# Altium PCB Pukk-Sensor-PCB.PcbDoc (part 2 of 6)
Units mil, origin at the board's own origin, x right, y up, seen from the top; angles counter-clockwise.
Board outline 3937.01 x 3149.61 mil, 4 copper layers (Top Layer, Layer 1, Layer 2, Bottom Layer), stack 61.653 mil thick; 261 components, 166 nets, 704 pads, 236 vias.
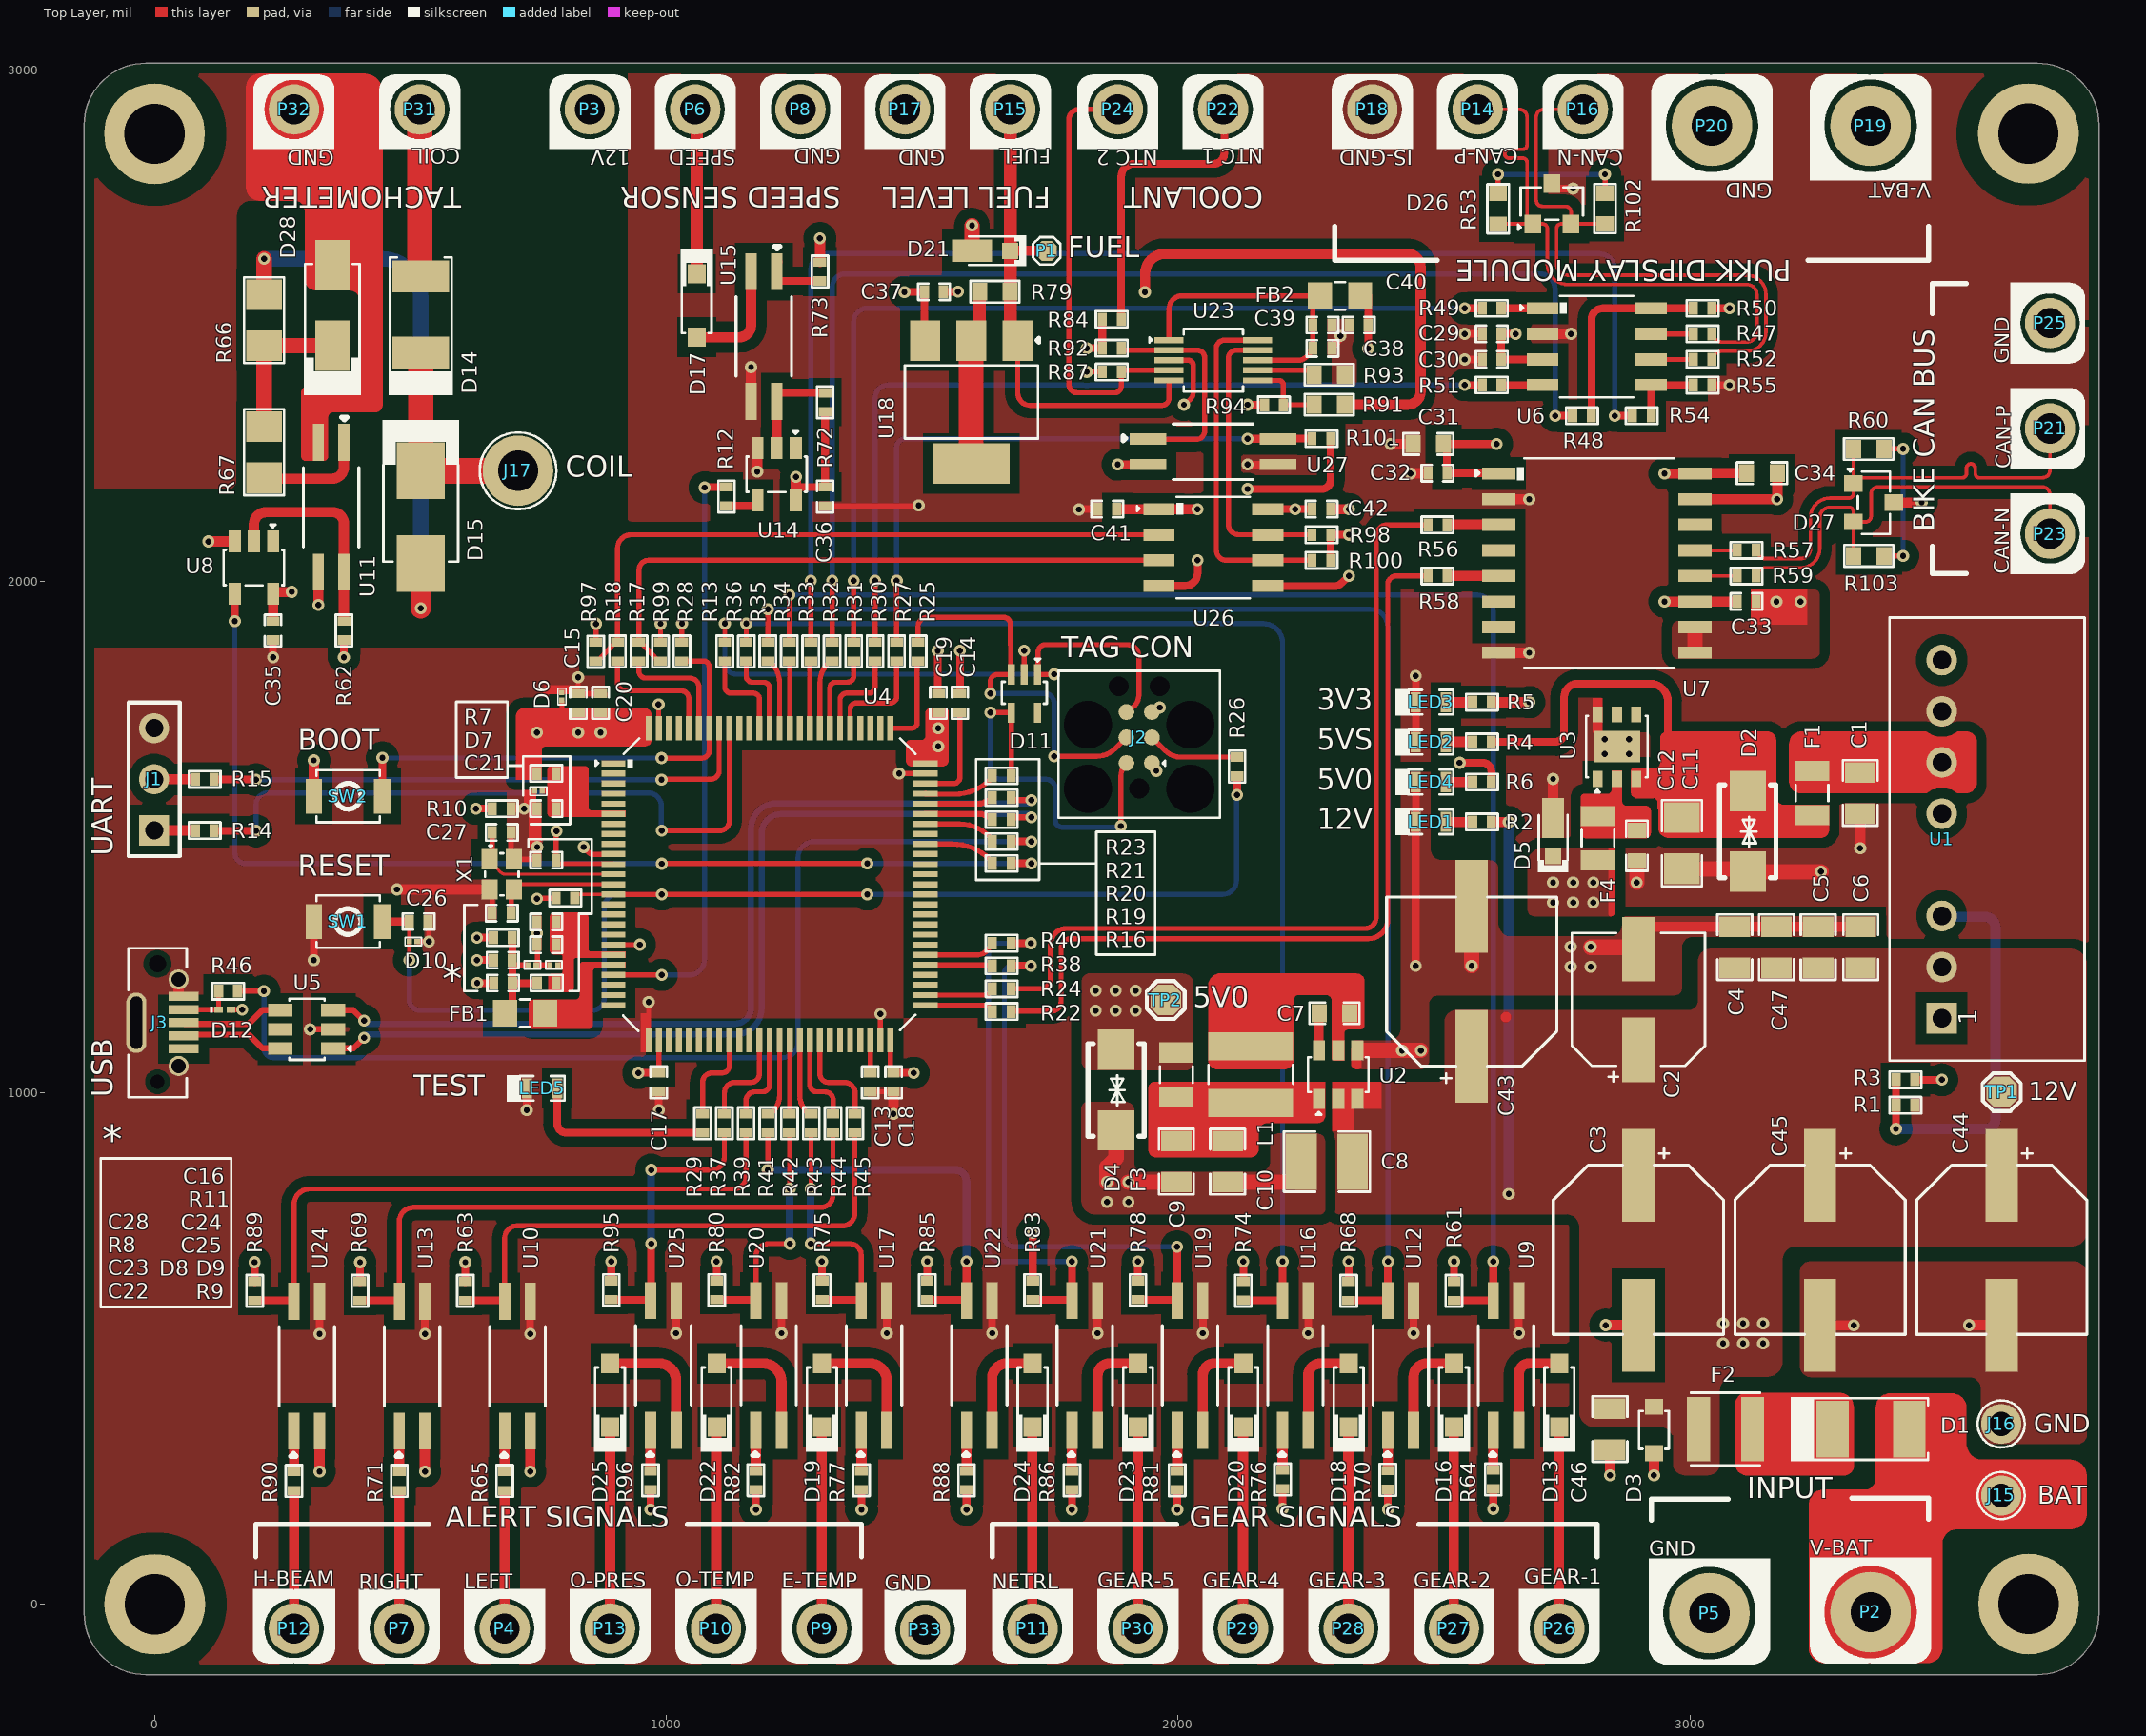
[diagram p0: Top Layer view]

## Part data (continued)
C16 C17 C18 C19 C20 C23 C25 C26 C29 C32 C33: library part CC0402JRX7R7BB104, "CAP CER 0.1UF 16V X7R 0402", Case Code (Imperial)=0402, Case Code (Metric)=1005, Dielectric=X7R, LCSC Part Number=C541464, Manufacturer=Yageo, Max Operating Temperature=125°C, Min Operating Temperature=-55°C, Package Quantity=10000, Supplier Part Number=311-1676-1-ND, Tolerance=5%, Voltage Rating=16V, Case/Package=0402, Category="Ceramic Capacitors", ComponentLink1Description=https://datasheet.ciiva.com/13210/upy-gphc-x7r-6-3v-to-50v-8-12304-13210152.pdf?src-supplier=Mouser, ComponentLink1URL=https://datasheet.ciiva.com/13210/upy-gphc-x7r-6-3v-to-50v-8-12304-13210152.pdf?src-supplier=Mouser, Construction=Flat, Halogen Free="Halogen Free", Height=0.5mm, Item Type=Capacitor, Lead Free="Lead Free", Length=0.039inch, Manufacturer Part Number=CC0402JRX7R7BB104, Material=4241ConductorMaterial, Mounting Technology="Surface Mount", Packaging="Tape and Reel", Pricing="1=0.1, 10=0.046, 50=0.0262, 100=0.0203, 500=0.01528, 1000=0.012, 2500=0.01091, 5000=0.01004 (USD)", RoHS=Yes, RoHS Compliant=Yes, Series=CC, Stock=1659111, Supplier=Digikey, Thickness=0.022inch, Voltage Rating (DC)=16V, Width=0.02inch
C21 C22 C24 C39 C40: library part CC0402KRX5R8BB105, "CAP CER 1UF 25V X5R 0402", Case Code (Imperial)=0402, Case Code (Metric)=1005, Dielectric=X5R, LCSC Part Number=C326568, Manufacturer=Yageo, Max Operating Temperature=85°C, Min Operating Temperature=-55°C, Package Quantity=10000, Supplier Part Number 1=603-CC402KRX5R8BB105, Tolerance=10%, Voltage Rating=25V, Capacitance=1uF, Case/Package=0402, Category="Ceramic Capacitors", ComponentLink1Description=http://www.mouser.com/ds/2/447/Yageo_UPY-GP_NP0_16V-to-50V_9-358835.pdf?src-supplier=Mouser, ComponentLink1URL=http://www.mouser.com/ds/2/447/Yageo_UPY-GP_NP0_16V-to-50V_9-358835.pdf?src-supplier=Mouser, ComponentLink2Description=http://www.yageo.com/documents/recent/UPY-GPHC_X5R_4V-to-50V_25.pdf?src-supplier=Digi-Key, ComponentLink2URL=http://www.yageo.com/documents/recent/UPY-GPHC_X5R_4V-to-50V_25.pdf?src-supplier=Digi-Key, ComponentLink3Description=https://4donline.ihs.com/images/VipMasterIC/IC/YAGO/YAGO-S-A0006851646/YAGO-S-A0006851646-1.pdf?hkey=6D3A4C79FDBF58556ACFDE234799DDF0&src-supplier=Newark, ComponentLink3URL=https://4donline.ihs.com/images/VipMasterIC/IC/YAGO/YAGO-S-A0006851646/YAGO-S-A0006851646-1.pdf?hkey=6D3A4C79FDBF58556ACFDE234799DDF0&src-supplier=Newark, Halogen Free="Halogen Free", Lead Free="Lead Free", Length=0.039inch, Manufacturer Part Number=CC0402KRX5R8BB105, Mount="Surface Mount", Packaging="Tape and Reel", Pricing 1="1=0.30000, 10=0.20400, 50=0.20400, 100=0.11600, 1000=0.07200, 10000=0.05900 (USD)", RoHS=Yes, RoHS Compliant=Yes, Stock 1=91975, Supplier 1=Mouser, Termination=SMD/SMT, Thickness=0.022inch, Voltage Rating (DC)=25V, Weight=2.3E-05oz, Width=0.02inch
C27 C28: library part GJM1555C1H120GB01D, "CAP CER 12PF 50V C0G/NP0 0402", Case Code (Imperial)=0402, Case Code (Metric)=1005, Dielectric=C0G, LCSC Part Number=C161305, Manufacturer=Murata, Max Operating Temperature=125°C, Min Operating Temperature=-55°C, Package Quantity=10000, Supplier Part Number 1=490-8078-1-ND, Tolerance=2%, Voltage Rating=50V, Capacitance=12pF, Case/Package=0402, Category="Ceramic Capacitors", ComponentLink1Description=https://datasheet.ciiva.com/11608/product-11608208.pdf?src-supplier=Avnet, ComponentLink1URL=https://datasheet.ciiva.com/11608/product-11608208.pdf?src-supplier=Avnet, ComponentLink2Description=https://datasheet.ciiva.com/29542/partnumbering-e-01-29542716.pdf?src-supplier=Digi-Key, ComponentLink2URL=https://datasheet.ciiva.com/29542/partnumbering-e-01-29542716.pdf?src-supplier=Digi-Key, ComponentLink3Description=https://datasheet.ciiva.com/29542/partnumbering-e-01-29542715.pdf?src-supplier=Digi-Key, ComponentLink3URL=https://datasheet.ciiva.com/29542/partnumbering-e-01-29542715.pdf?src-supplier=Digi-Key, ComponentLink4Description=https://datasheet.ciiva.com/29542/partnumbering-e-01-29542717.pdf?src-supplier=Digi-Key, ComponentLink4URL=https://datasheet.ciiva.com/29542/partnumbering-e-01-29542717.pdf?src-supplier=Digi-Key, Construction=Flat, Depth=0.5mm, Height=0.5mm, Lead Free="Lead Free", Length=1mm, Manufacturer Part Number=GJM1555C1H120GB01D, Mount="Surface Mount", Packaging="Tape and Reel", Pricing 1="1=0.18000, 10=0.12600, 50=0.07560, 100=0.06390, 500=0.04370, 1000=0.03865, 2500=0.03698, 5000=0.03361 (USD)", Radiation Hardening=No, RoHS=Yes, RoHS Compliant=Yes, Series=GJM, Stock 1=266975, Supplier 1=Digi-Key, Termination=SMD/SMT, Thickness=0.022inch, Voltage Rating (DC)=50V, Width=0.5mm
C35 C36 C37 C38 C41 C42: library part CC0402KRX7R8BB104, "CAP CER 0.1UF 25V X7R 0402", Capacitance=100nF, Case Code (Imperial)=0402, Case Code (Metric)=1005, Dielectric=X7R, LCSC Part Number=C105883, Manufacturer=Yageo, Max Operating Temperature=125°C, Min Operating Temperature=-55°C, Resistor Type=Ceramic, Supplier Part Number 1=311-2077-1-ND, Tolerance=10%, Voltage Rating=25V, Case/Package=0402, Category="Ceramic Capacitors", ComponentLink1Description=https://datasheet.ciiva.com/11464/upy-gphc-x7r-6-3v-to-50v-8-11464889.pdf?src-supplier=Avnet, ComponentLink1URL=https://datasheet.ciiva.com/11464/upy-gphc-x7r-6-3v-to-50v-8-11464889.pdf?src-supplier=Avnet, ComponentLink2Description=https://datasheet.ciiva.com/13210/upy-gphc-x7r-6-3v-to-50v-8-12304-13210908.pdf?src-supplier=Mouser, ComponentLink2URL=https://datasheet.ciiva.com/13210/upy-gphc-x7r-6-3v-to-50v-8-12304-13210908.pdf?src-supplier=Mouser, ComponentLink3Description=https://datasheet.ciiva.com/17437/upy-gphc-x7r-6-3v-to-50v-8-17437357.pdf?src-supplier=Avnet+Europe, ComponentLink3URL=https://datasheet.ciiva.com/17437/upy-gphc-x7r-6-3v-to-50v-8-17437357.pdf?src-supplier=Avnet+Europe, Depth=0.5mm, Dissipation Factor=3.5%, Halogen Free="Halogen Free", Height=0.5mm, Lead Free="Lead Free", Length=1mm, Manufacturer Part Number=CC0402KRX7R8BB104, Mount="Surface Mount", Packaging="Tape and Reel", Pricing 1="1=0.10000, 10=0.03100, 50=0.01700, 100=0.01390, 500=0.00990, 1000=0.00777, 2500=0.00707, 5000=0.00650 (USD)", Radiation Hardening=No, RoHS=Yes, Stock 1=1841009, Supplier 1=Digi-Key, Termination=SMD/SMT, Thickness=0.022inch, Voltage Rating (DC)=25V, Width=0.02inch
C46: library part GRM21BR61E226ME44L, "CAP CER 22UF 25V X5R 0805", Case Code (Imperial)=0805, Case Code (Metric)=2012, Dielectric=X5R, LCSC Part Number=C86816, Manufacturer=Murata, Max Operating Temperature=85°C, Min Operating Temperature=-55°C, Package Quantity=3000, Resistor Type=Ceramic, Tolerance=20%, Voltage=25V, Capacitance=22uF, Case/Package=0805, Category="Ceramic Capacitors", ComponentLink1Description=https://datasheet.ciiva.com/22787/1747471-22787265.pdf?src-supplier=Farnell, ComponentLink1URL=https://datasheet.ciiva.com/22787/1747471-22787265.pdf?src-supplier=Farnell, ComponentLink2Description=https://datasheet.ciiva.com/7719/1747471-7719095.pdf?src-supplier=Element14, ComponentLink2URL=https://datasheet.ciiva.com/7719/1747471-7719095.pdf?src-supplier=Element14, ComponentLink3Description=https://datasheet.ciiva.com/28584/1747471-28584199.pdf?src-supplier=Element14, ComponentLink3URL=https://datasheet.ciiva.com/28584/1747471-28584199.pdf?src-supplier=Element14, Construction=Flat, Depth=1.25mm, Height=1.25mm, Item Type=Capacitor, Lead Free="Lead Free", Length=2mm, Manufacturer Part Number=GRM21BR61E226ME44L, Material=Ceramic, Mount="Surface Mount", Packaging="Tape and Reel", Pricing 1="1=0.45930, 10=0.35000, 25=0.33950, 50=0.26910, 100=0.22090, 250=0.21320, 500=0.16760, 1000=0.14640, 3000=0.11710, 6000=0.10550, 15000=0.10450 (USD)", REACH SVHC="No SVHC", RoHS=Yes, RoHS Compliant=Yes, Series=GRM, Stock 1=21193, Supplier 1="Arrow Electronics", Supplier Part Number 1=GRM21BR61E226ME44L, Termination=SMD/SMT, Thickness=0.057inch, Voltage Rating=25V, Voltage Rating (DC)=25V, Weight=0.000335oz, Width=1.25mm
C47: library part CC0805KKX7R8BB475, "CAP CER 4.7UF 25V X7R 0805", Case Code (Imperial)=0805, Case Code (Metric)=2012, Dielectric=X7R, LCSC Part Number=C354262, Manufacturer=Yageo, Max Operating Temperature=125°C, Min Operating Temperature=-55°C, Package Quantity=3000, Tolerance=10%, Voltage Rating=25V, Case/Package=0805, ComponentLink1Description=http://www.mouser.com/ds/2/447/Yageo_UPY-GP_NP0_16V-to-50V_9-358835.pdf?src-supplier=Mouser, ComponentLink1URL=http://www.mouser.com/ds/2/447/Yageo_UPY-GP_NP0_16V-to-50V_9-358835.pdf?src-supplier=Mouser, ComponentLink2Description=http://www.yageo.com/documents/recent/UPY-GPHC_X7R_6.3V-to-50V_18.pdf?src-supplier=Digikey, ComponentLink2URL=http://www.yageo.com/documents/recent/UPY-GPHC_X7R_6.3V-to-50V_18.pdf?src-supplier=Digikey, ComponentLink3Description=https://www.yageo.com/upload/media/product/productsearch/datasheet/mlcc/UPY-GPHC_X7R_6.3V-to-50V_18.pdf?src-supplier=Digikey, ComponentLink3URL=https://www.yageo.com/upload/media/product/productsearch/datasheet/mlcc/UPY-GPHC_X7R_6.3V-to-50V_18.pdf?src-supplier=Digikey, ComponentLink4Description=https://datasheet.octopart.com/CC0805KKX7R8BB475-Yageo-datasheet-166511530.pdf?src-supplier=Future+Electronics, ComponentLink4URL=https://datasheet.octopart.com/CC0805KKX7R8BB475-Yageo-datasheet-166511530.pdf?src-supplier=Future+Electronics, ComponentLink5Description=https://datasheet.octopart.com/CC0805KKX7R8BB475-Yageo-datasheet-140260305.pdf?src-supplier=Newark, ComponentLink5URL=https://datasheet.octopart.com/CC0805KKX7R8BB475-Yageo-datasheet-140260305.pdf?src-supplier=Newark, ComponentLink6Description=https://datasheet.octopart.com/CC0805KKX7R8BB475-Yageo-datasheet-137700082.pdf?src-supplier=Future+Electronics, ComponentLink6URL=https://datasheet.octopart.com/CC0805KKX7R8BB475-Yageo-datasheet-137700082.pdf?src-supplier=Future+Electronics, Halogen Free=5694HalogenFree, Height=950um, Item Type=Capacitors, Lead Free=5697LeadFree, Manufacturer Part Number=CC0805KKX7R8BB475, Material=4241ConductorMaterial, Mounting Technology="Surface Mount", Packaging="Tape and Reel", Pricing="25=1.316, 250=1.053, 500=0.856, 1000=0.724, 2500=0.658 (DKK)", RoHS=Yes, RoHS Compliant=Yes, Series=CC, Stock=150, Supplier=Rs, Termination=SMD/SMT, Voltage Rating (DC)=25V, Weight=0.000194oz
D1: "60V 700mV@2A 2A SMA(DO-214AC) Schottky Barrier Diodes (SBD) ROHS", LCSC Part Number=C14238, Manufacturer=MDD, Package=SMA(DO-214AC), ComponentLink1Description=LCSC, ComponentLink1URL=https://www.lcsc.com/product-detail/Schottky-Barrier-Diodes-SBD_MDD-Microdiode-Electronics-SS26_C14238.html, Item Type=Diode, Manufacturer Part Number=SS26
D2 D4: "TVS DIODE 5VWM 9.2VC SMA", LCSC Part Number=C693487, Manufacturer=FTR, Package=SMA(DO-214AC), ComponentLink1Description=LCSC, ComponentLink1URL=https://www.lcsc.com/product-detail/TVS_GOODWORK-SMAJ5-0CA_C908809.html, Item Type=Diode, Manufacturer Part Number=SMAJ5.0CA
D3: "29V 350W 16.7V 15V SOD-323 ESD and Surge Protection (TVS/ESD) ROHS", LCSC Part Number=C780130, Manufacturer=SEMTECH, Package=SOD-323, ComponentLink1Description=LCSC, ComponentLink1URL=https://www.lcsc.com/product-detail/ESD-and-Surge-Protection-TVS-ESD_SEMTECH-SD15C-TCT_C780130.html?s_z=n_SD15C.TCT, Item Type=(TVS/ESD), Manufacturer Part Number=SD15C.TCT
D5: "TVS DIODE 3.3VWM 11.5VC MICROSMP", Breakdown Voltage=4.1V, Clamping Voltage=11V, LCSC Part Number=C241899, Manufacturer="Vishay Semiconductors", Max Operating Temperature=150°C, Max Reverse Leakage Current=200uA, Max Surge Current=75A, Min Operating Temperature=-55°C, Operating Supply Voltage=3.3V, Package Quantity=4500, Peak Pulse Current=87A, Peak Pulse Power=150W, Power Line Protection=No, Supplier Part Number=625-MSP3V3HM3, Test Current=1mA, Category="TVS Diodes", ComponentLink1Description=https://datasheet.ciiva.com/14080/msp3v3-14080471.pdf?src-supplier=Digikey, ComponentLink1URL=https://datasheet.ciiva.com/14080/msp3v3-14080471.pdf?src-supplier=Digikey, ComponentLink2Description=https://datasheet.ciiva.com/14080/msp3v3-14080471.pdf?src-supplier=Digi-Key, ComponentLink2URL=https://datasheet.ciiva.com/14080/msp3v3-14080471.pdf?src-supplier=Digi-Key, Diode Type=ZENER, Direction=Unidirectional, Item Type="TVS Diode", Manufacturer Part Number=MSP3V3HM3/89A, Min Breakdown Voltage=4.1V, Mounting Technology="Surface Mount", Number of Unidirectional Channels=1, Packaging="Tape and Reel", Polarity=Unidirectional, Pricing="1=0.39, 10=0.313, 50=0.313, 100=0.165, 1000=0.068, 10000=0.05 (USD)", Reverse Standoff Voltage=3.3V, RoHS=Yes, RoHS Compliant=Yes, Series="Automotive, AEC-Q101, TransZorb®, eSMP™", Stock=14861, Supplier=Mouser
D6 D7 D8 D9 D10: "DIODE BIDIR ESD X4DFN2", LCSC Part Number=C896720, Manufacturer="ON Semiconductor", Item Type=(TVS/ESD), Manufacturer Part Number=ESDM2033MX4T5G, Pricing="8961=0.04129, 9000=0.04018, 18000=0.03906, 45000=0.03794, 90000=0.03683, 450000=0.03571, 900000=0.0346 (USD)", RoHS=Yes, Series=-, Stock=629400, Supplier=Avnet
D11: "TVS DIODE 3VWM SOT323-5", LCSC Part Number=C703691, Manufacturer=STMicroelectronics, ComponentLink1Description=https://datasheet.ciiva.com/23847/cd00002946-23847220.pdf?src-supplier=Newark, ComponentLink1URL=https://datasheet.ciiva.com/23847/cd00002946-23847220.pdf?src-supplier=Newark, ComponentLink2Description=https://datasheet.ciiva.com/4509/cd00002946-81943-4509940.pdf?src-supplier=Mouser, ComponentLink2URL=https://datasheet.ciiva.com/4509/cd00002946-81943-4509940.pdf?src-supplier=Mouser, ComponentLink3Description=https://datasheet.ciiva.com/5782/cd00002946-5782886.pdf?src-supplier=Farnell, ComponentLink3URL=https://datasheet.ciiva.com/5782/cd00002946-5782886.pdf?src-supplier=Farnell, ComponentLink4Description=https://datasheet.ciiva.com/338/cd00002946-338376.pdf?src-supplier=Digikey, ComponentLink4URL=https://datasheet.ciiva.com/338/cd00002946-338376.pdf?src-supplier=Digikey, ComponentLink5Description=https://datasheet.ciiva.com/338/cd00002946-338377.pdf?src-supplier=Digikey, ComponentLink5URL=https://datasheet.ciiva.com/338/cd00002946-338377.pdf?src-supplier=Digikey, ComponentLink6Description=https://datasheet.ciiva.com/338/cd00002946-338378.pdf?src-supplier=Digikey, ComponentLink6URL=https://datasheet.ciiva.com/338/cd00002946-338378.pdf?src-supplier=Digikey, Item Type="TVS Diodes", Manufacturer Part Number=ESDALC6V1W5, Pricing="3000=0.0569, 9000=0.0547, 12000=0.0774, 15000=0.0538, 30000=0.0749, 45000=0.0518, 75000=0.05 (USD)", RoHS=Yes, Stock=3000, Supplier="Future Electronics"
D12: "TVS DIODE 3VWM ST0201", Breakdown Voltage=6.1V, Case Code (Imperial)=0201, Case Code (Metric)=0603, Clamping Voltage=12.2V, Leakage Current=100nA, Manufacturer=STMicroelectronics, Max Breakdown Voltage=8V, Max Operating Temperature=125°C, Max Power Dissipation=20W, Min Operating Temperature=-40°C, Peak Pulse Current=2A, Power Line Protection=No, Reverse Standoff Voltage=3V, Supplier Part Number=3110124, Test Current=1mA, Case/Package=0201, Category="TVS Diodes", ComponentLink1Description=https://datasheet.ciiva.com/1276/1684876-1276912.pdf?src-supplier=Element14, ComponentLink1URL=https://datasheet.ciiva.com/1276/1684876-1276912.pdf?src-supplier=Element14, ComponentLink2Description=https://datasheet.ciiva.com/4507/cd00212838-88488-4507763.pdf?src-supplier=Mouser, ComponentLink2URL=https://datasheet.ciiva.com/4507/cd00212838-88488-4507763.pdf?src-supplier=Mouser, ComponentLink3Description=https://datasheet.ciiva.com/16205/cd00212838-16205762.pdf?src-supplier=Future+Electronics, ComponentLink3URL=https://datasheet.ciiva.com/16205/cd00212838-16205762.pdf?src-supplier=Future+Electronics, ComponentLink4Description=https://datasheet.ciiva.com/15143/getdatasheetpartid-185245-15143908.pdf?src-supplier=Verical, ComponentLink4URL=https://datasheet.ciiva.com/15143/getdatasheetpartid-185245-15143908.pdf?src-supplier=Verical, ComponentLink5Description=https://datasheet.ciiva.com/22695/1684876-22695674.pdf?src-supplier=Element14, ComponentLink5URL=https://datasheet.ciiva.com/22695/1684876-22695674.pdf?src-supplier=Element14, ComponentLink6Description=https://datasheet.ciiva.com/337/cd00212838-337652.pdf?src-supplier=Digikey, ComponentLink6URL=https://datasheet.ciiva.com/337/cd00212838-337652.pdf?src-supplier=Digikey, ComponentLink7Description=https://datasheet.ciiva.com/337/cd00212838-337651.pdf?src-supplier=Digikey, ComponentLink7URL=https://datasheet.ciiva.com/337/cd00212838-337651.pdf?src-supplier=Digikey, ComponentLink8Description=https://datasheet.ciiva.com/337/cd00212838-337653.pdf?src-supplier=Digikey, ComponentLink8URL=https://datasheet.ciiva.com/337/cd00212838-337653.pdf?src-supplier=Digikey, ComponentLink9Description=https://datasheet.ciiva.com/11193/cd00212838-11193350.pdf?src-supplier=Avnet, ComponentLink9URL=https://datasheet.ciiva.com/11193/cd00212838-11193350.pdf?src-supplier=Avnet, ComponentLink10Description=https://datasheet.ciiva.com/41443/001184301-da-01-en-transil-sgl-un-esdalc6v1-1u2-st-0201-stm-41443159.pdf?src-supplier=Conrad, ComponentLink10URL=https://datasheet.ciiva.com/41443/001184301-da-01-en-transil-sgl-un-esdalc6v1-1u2-st-0201-stm-41443159.pdf?src-supplier=Conrad, Depth=0.3mm, Diode Type=ZENER, Direction=Unidirectional, ESD Protection=Yes, Height=0.33mm, Lead Free="Lead Free", Length=0.6mm, Manufacturer Part Number=ESDALC6V1-1U2, Max Reverse Leakage Current=100nA, Min Breakdown Voltage=6.1V, Mounting Technology="Surface Mount", Number of Channels=1, Number of Elements=1, Number of Unidirectional Channels=1, Packaging="Tape and Reel", Peak Pulse Power=20W, Pins=2, Polarity=Unidirectional, Power Dissipation=20W, Pricing="15000=0.0377, 45000=0.0364, 60000=0.0361, 150000=0.0351, 225000=0.0341 (USD)", Radiation Hardening=No, Reach SVHC Compliant=No, Reverse Breakdown Voltage=6.1V, RoHS=Yes, RoHS Compliant=Yes, Series="ESDA, TRANSIL™", Stock=405000, Supplier="Future Electronics", Termination=SMD/SMT, Width=0.35mm
D13 D16 D18 D19 D20 D22 D23 D24 D25: "100V 400mW Single 1.25V@150mA 8ns 300mA SOD-123 Switching Diode ROHS", LCSC Part Number=C917030, Manufacturer=JSMSEMI, Package=SOD-123, ComponentLink1Description=LCSC, ComponentLink1URL=https://www.lcsc.com/product-detail/Switching-Diode_JSMSEMI-1N4148W_C917030.html, Item Type=Diode, Manufacturer Part Number=1N4148W
D14: "DIODE STANDARD 100V 1A DO214AC", LCSC Part Number=C232818, Manufacturer="ON Semiconductor / Fairchild", ComponentLink1Description=https://datasheet.ciiva.com/13095/es1b-187537-13095611.pdf?src-supplier=Mouser, ComponentLink1URL=https://datasheet.ciiva.com/13095/es1b-187537-13095611.pdf?src-supplier=Mouser, ComponentLink2Description=https://datasheet.ciiva.com/918/es1a-918414.pdf?src-supplier=Digikey, ComponentLink2URL=https://datasheet.ciiva.com/918/es1a-918414.pdf?src-supplier=Digikey, ComponentLink3Description=https://datasheet.ciiva.com/918/es1a-918415.pdf?src-supplier=Digikey, ComponentLink3URL=https://datasheet.ciiva.com/918/es1a-918415.pdf?src-supplier=Digikey, ComponentLink4Description=https://datasheet.ciiva.com/918/es1a-918416.pdf?src-supplier=Digikey, ComponentLink4URL=https://datasheet.ciiva.com/918/es1a-918416.pdf?src-supplier=Digikey, ComponentLink5Description=https://datasheet.ciiva.com/28468/575529-28468958.pdf?src-supplier=Element14, ComponentLink5URL=https://datasheet.ciiva.com/28468/575529-28468958.pdf?src-supplier=Element14, ComponentLink6Description=https://datasheet.ciiva.com/7965/575529-7965132.pdf?src-supplier=Element14, ComponentLink6URL=https://datasheet.ciiva.com/7965/575529-7965132.pdf?src-supplier=Element14, Item Type=Diodes, Manufacturer Part Number=ES1B, Pricing="7500=0.0732, 22500=0.0629 (USD)", RoHS=Yes, Stock=142500, Supplier="Arrow Electronics"
D15: "DIODE ZENER 100V 3W SMB", LCSC Part Number=C150045, Manufacturer="ON Semiconductor", ComponentLink1Description=https://datasheet.ciiva.com/15142/getdatasheetpartid-53879-15142134.pdf?src-supplier=Verical, ComponentLink1URL=https://datasheet.ciiva.com/15142/getdatasheetpartid-53879-15142134.pdf?src-supplier=Verical, ComponentLink2Description=https://datasheet.ciiva.com/18434/70099466-18434616.pdf?src-supplier=Allied+Electronics, ComponentLink2URL=https://datasheet.ciiva.com/18434/70099466-18434616.pdf?src-supplier=Allied+Electronics, ComponentLink3Description=https://datasheet.ciiva.com/895/1smb5913bt3-d-895236.pdf?src-supplier=Digikey, ComponentLink3URL=https://datasheet.ciiva.com/895/1smb5913bt3-d-895236.pdf?src-supplier=Digikey, ComponentLink4Description=https://datasheet.ciiva.com/895/1smb5913bt3-d-895237.pdf?src-supplier=Digikey, ComponentLink4URL=https://datasheet.ciiva.com/895/1smb5913bt3-d-895237.pdf?src-supplier=Digikey, ComponentLink5Description=https://datasheet.ciiva.com/895/1smb5913bt3-d-895238.pdf?src-supplier=Digikey, ComponentLink5URL=https://datasheet.ciiva.com/895/1smb5913bt3-d-895238.pdf?src-supplier=Digikey, ComponentLink6Description=https://datasheet.ciiva.com/8346/1smb5913bt3-d-8346409.pdf?src-supplier=Avnet, ComponentLink6URL=https://datasheet.ciiva.com/8346/1smb5913bt3-d-8346409.pdf?src-supplier=Avnet, Item Type=Diodes, Manufacturer Part Number=1SMB5949BT3G, Pricing="2500=0.0809 (USD)", RoHS=Yes, Stock=10000, Supplier="Arrow Electronics"
D17: "DIODE GEN PURP 100V 300MA SOD123", Average Rectified Current=300mA, Current Rating=150mA, Forward Voltage=1.25V, LCSC Part Number=C83528, Manufacturer=Diodes, Max Forward Surge Current (Ifsm)=2A, Max Operating Temperature=150°C, Max Repetitive Reverse Voltage (Vrrm)=100V, Max Reverse Current=1uA, Min Operating Temperature=-65°C, Package Quantity=3000, Power Dissipation=400mW, Supplier Part Number 1=7634694, Voltage Rating (DC)=75V, Category="Rectifier Diodes", ComponentLink1Description=https://datasheet.ciiva.com/1179/1915529-1179304.pdf?src-supplier=Element14, ComponentLink1URL=https://datasheet.ciiva.com/1179/1915529-1179304.pdf?src-supplier=Element14, ComponentLink2Description=https://datasheet.ciiva.com/22695/1915529-22695239.pdf?src-supplier=Element14, ComponentLink2URL=https://datasheet.ciiva.com/22695/1915529-22695239.pdf?src-supplier=Element14, ComponentLink3Description=https://datasheet.ciiva.com/8300/ds30086-8300392.pdf?src-supplier=Avnet, ComponentLink3URL=https://datasheet.ciiva.com/8300/ds30086-8300392.pdf?src-supplier=Avnet, ComponentLink4Description=https://datasheet.ciiva.com/15219/getdatasheetpartid-110030-15219548.pdf?src-supplier=Verical, ComponentLink4URL=https://datasheet.ciiva.com/15219/getdatasheetpartid-110030-15219548.pdf?src-supplier=Verical, ComponentLink5Description=https://datasheet.ciiva.com/8303/ds30086-8303197.pdf?src-supplier=Avnet, ComponentLink5URL=https://datasheet.ciiva.com/8303/ds30086-8303197.pdf?src-supplier=Avnet, ComponentLink6Description=https://datasheet.ciiva.com/911/ds30086-911735.pdf?src-supplier=Digi-Key, ComponentLink6URL=https://datasheet.ciiva.com/911/ds30086-911735.pdf?src-supplier=Digi-Key, ComponentLink7Description=https://datasheet.ciiva.com/911/ds30086-911736.pdf?src-supplier=Digi-Key, ComponentLink7URL=https://datasheet.ciiva.com/911/ds30086-911736.pdf?src-supplier=Digi-Key, ComponentLink8Description=https://datasheet.ciiva.com/911/ds30086-911734.pdf?src-supplier=Digi-Key, ComponentLink8URL=https://datasheet.ciiva.com/911/ds30086-911734.pdf?src-supplier=Digi-Key, ComponentLink9Description=https://datasheet.ciiva.com/4435/ds30086-4435128.pdf?src-supplier=Mouser, ComponentLink9URL=https://datasheet.ciiva.com/4435/ds30086-4435128.pdf?src-supplier=Mouser, Contact Plating=Tin,Matte, Element Configuration=Single, Forward Current=150mA, Height=1.25mm, Item Type=Diode, Lead Free="Lead Free", Length=2.85mm, Manufacturer Part Number=1N4148W-7-F, Max Reverse Voltage (DC)=100V, Max Surge Current=2A, Mounting Technology="Surface Mount", Output Current=150mA, Packaging="Tape and Reel", Peak Non-Repetitive Surge Current=2A, Pins=2, Polarity=Standard, Power Rating=400mW, Pricing 1="3000=0.01840, 12000=0.01760, 45000=0.01690, 120000=0.01640, 300000=0.01560 (USD)", Radiation Hardening=No, Reach SVHC Compliant=Yes, Recovery Time=4ns, Reverse Recovery Time=4ns, Reverse Recovery Time-Max=4ns, RoHS=Yes, RoHS Compliant=Yes, Series=-, Stock 1=32931000, Supplier 1="Future Electronics", Voltage=100V, Weight=0.000353oz, Width=1.7mm
D21: "TVS DIODE 3.3VWM 11.5VC MICROSMP", Breakdown Voltage=4.1V, Clamping Voltage=11V, LCSC Part Number=C241899, Max Operating Temperature=150°C, Max Reverse Leakage Current=200uA, Max Surge Current=75A, Min Operating Temperature=-55°C, Operating Supply Voltage=3.3V, Package Quantity=4500, Peak Pulse Current=87A, Peak Pulse Power=150W, Power Line Protection=No, Supplier Part Number=625-MSP3V3HM3, Test Current=1mA, Category="TVS Diodes", ComponentLink1Description=LCSC, ComponentLink2Description=https://datasheet.ciiva.com/14080/msp3v3-14080471.pdf?src-supplier=Digi-Key, ComponentLink2URL=https://datasheet.ciiva.com/14080/msp3v3-14080471.pdf?src-supplier=Digi-Key, Diode Type=ZENER, Direction=Unidirectional, Item Type="TVS Diode", Min Breakdown Voltage=4.1V, Mounting Technology="Surface Mount", Number of Unidirectional Channels=1, Packaging="Tape and Reel", Polarity=Unidirectional, Pricing="1=0.39, 10=0.313, 50=0.313, 100=0.165, 1000=0.068, 10000=0.05 (USD)", Reverse Standoff Voltage=3.3V, RoHS=Yes, RoHS Compliant=Yes, Series="Automotive, AEC-Q101, TransZorb®, eSMP™", Stock=15021, Supplier=Mouser
D26 D27: "TVS DIODE 24VWM 40VC SOT23-3", LCSC Part Number=C350941, Manufacturer=Bourns, ComponentLink1Description=http://www.farnell.com/datasheets/2372435.pdf?src-supplier=Farnell, ComponentLink1URL=http://www.farnell.com/datasheets/2372435.pdf?src-supplier=Farnell, ComponentLink2Description=https://www.bourns.com/docs/Product-Datasheets/cdsot23-t24can-Q.pdf?src-supplier=Digikey, ComponentLink2URL=https://www.bourns.com/docs/Product-Datasheets/cdsot23-t24can-Q.pdf?src-supplier=Digikey, ComponentLink3Description=http://www.farnell.com/datasheets/2372435.pdf?src-supplier=Newark, ComponentLink3URL=http://www.farnell.com/datasheets/2372435.pdf?src-supplier=Newark, Item Type="TVS Diodes", Manufacturer Part Number=CDSOT23-T24CAN-Q, Pricing="1=0.36, 10=0.282, 100=0.1691, 500=0.15656, 1000=0.10645, 3000=0.098, 6000=0.09393, 9000=0.08454, 30000=0.08328, 75000=0.07827 (USD)", RoHS=Yes, RoHS Compliant=5897YesNo, Stock=17231, Supplier=Digikey
D28: "Independent Type 40.9V~45.6V 1W 43V SMA Zener Diodes ROHS", LCSC Part Number=C438373, Manufacturer="Shandong Jingdao Microelectronics", Package=SMA, ComponentLink1Description=LCSC, ComponentLink1URL=https://www.lcsc.com/product-detail/Zener-Diodes_Shandong-Jingdao-Microelectronics-1SMA4755A_C438373.html, Item Type=Diode, Manufacturer Part Number=1SMA4755A
F1 F4: "PTC RESET FUSE 6V 1.1A 0805", LCSC Part Number=C207024, Manufacturer=Littelfuse, ComponentLink1Description=https://datasheet.ciiva.com/326/littelfuse-resettable-ptcs-lorho-datasheet-326160.pdf?src-supplier=Digikey, ComponentLink1URL=https://datasheet.ciiva.com/326/littelfuse-resettable-ptcs-lorho-datasheet-326160.pdf?src-supplier=Digikey, ComponentLink2Description=https://datasheet.ciiva.com/28410/949281-28410775.pdf?src-supplier=Element14, ComponentLink2URL=https://datasheet.ciiva.com/28410/949281-28410775.pdf?src-supplier=Element14, Item Type=Fuses, Manufacturer Part Number=0805L110SLYR, Pricing="1=1.74, 5=1.448, 10=1.339, 50=1.1156, 100=1.0309, 250=0.92832, 500=0.85714, 1000=0.79108 (USD)", RoHS=Yes, Stock=3032, Supplier=Digikey
F2: "24V 750mA 100A 1.5A 1210 Resettable Fuses ROHS", Current Rating=100A, LCSC Part Number=C207045, Manufacturer=Littlefuse, Supplier Part Number=F4146CT-ND, Voltage Rating=24V, Category="PTC Resettable Fuses", ComponentLink1Description=https://datasheet.ciiva.com/8005/littelfuse-ptc-1210l-8005372.pdf?src-supplier=Element14, ComponentLink1URL=https://datasheet.ciiva.com/8005/littelfuse-ptc-1210l-8005372.pdf?src-supplier=Element14, ComponentLink2Description=https://datasheet.ciiva.com/326/littelfuse-ptc-1210l-326060.pdf?src-supplier=Digikey, ComponentLink2URL=https://datasheet.ciiva.com/326/littelfuse-ptc-1210l-326060.pdf?src-supplier=Digikey, ComponentLink3Description=https://datasheet.ciiva.com/326/littelfuse-ptc-1210l-326061.pdf?src-supplier=Digikey, ComponentLink3URL=https://datasheet.ciiva.com/326/littelfuse-ptc-1210l-326061.pdf?src-supplier=Digikey, ComponentLink4Description=https://datasheet.ciiva.com/326/littelfuse-ptc-1210l-326062.pdf?src-supplier=Digikey, ComponentLink4URL=https://datasheet.ciiva.com/326/littelfuse-ptc-1210l-326062.pdf?src-supplier=Digikey, Height=1.8mm, Item Type=Fuse, Lead Free=5697LeadFree, Manufacturer Part Number=1210L075/24PR, Pricing="1=0.98, 5=0.81, 10=0.747, 50=0.6196, 100=0.5716, 250=0.51376, 500=0.47378, 1000=0.43676 (USD)", RoHS=Yes, Stock=2300, Supplier=Digikey
F3: "6V 500mA 100A 1A 0805 Resettable Fuses ROHS", LCSC Part Number=C207022, Manufacturer=Littelfuse, Supplier Part Number=F2772CT-ND, Voltage Rating=6V, Category="PTC Resettable Fuses", ComponentLink1Description=https://datasheet.ciiva.com/326/littelfuse-ptc-0805l-326196.pdf?src-supplier=Digikey, ComponentLink1URL=https://datasheet.ciiva.com/326/littelfuse-ptc-0805l-326196.pdf?src-supplier=Digikey, ComponentLink2Description=https://datasheet.ciiva.com/4501/littelfuse-0805l-32472-4501285.pdf?src-supplier=Mouser, ComponentLink2URL=https://datasheet.ciiva.com/4501/littelfuse-0805l-32472-4501285.pdf?src-supplier=Mouser, ComponentLink3Description=https://datasheet.ciiva.com/28410/147852-28410764.pdf?src-supplier=Element14, ComponentLink3URL=https://datasheet.ciiva.com/28410/147852-28410764.pdf?src-supplier=Element14, ComponentLink4Description=https://datasheet.ciiva.com/8005/littelfuse-0805-8005343.pdf?src-supplier=Element14, ComponentLink4URL=https://datasheet.ciiva.com/8005/littelfuse-0805-8005343.pdf?src-supplier=Element14, ComponentLink5Description=https://datasheet.ciiva.com/1273/611626-1273580.pdf?src-supplier=Element14, ComponentLink5URL=https://datasheet.ciiva.com/1273/611626-1273580.pdf?src-supplier=Element14, ComponentLink6Description=https://datasheet.ciiva.com/15186/getdatasheetpartid-27833-15186860.pdf?src-supplier=Verical, ComponentLink6URL=https://datasheet.ciiva.com/15186/getdatasheetpartid-27833-15186860.pdf?src-supplier=Verical, ComponentLink7Description=https://datasheet.ciiva.com/16389/littelfuse-0805-16389019.pdf?src-supplier=Future+Electronics, ComponentLink7URL=https://datasheet.ciiva.com/16389/littelfuse-0805-16389019.pdf?src-supplier=Future+Electronics, ComponentLink8Description=https://datasheet.ciiva.com/326/littelfuse-ptc-0805l-326197.pdf?src-supplier=Digikey, ComponentLink8URL=https://datasheet.ciiva.com/326/littelfuse-ptc-0805l-326197.pdf?src-supplier=Digikey, ComponentLink9Description=https://datasheet.ciiva.com/326/littelfuse-ptc-0805l-326198.pdf?src-supplier=Digikey, ComponentLink9URL=https://datasheet.ciiva.com/326/littelfuse-ptc-0805l-326198.pdf?src-supplier=Digikey, Height=1.25mm, Item Type=Fuse, Lead Free=5697LeadFree, Manufacturer Part Number=0805L050WR, Pricing="1=0.5, 5=0.41, 10=0.378, 50=0.314, 100=0.2897, 250=0.2604, 500=0.2402, 1000=0.2215 (USD)", RoHS=Yes, Stock=52328, Supplier=DigiKey, Width=1.2mm
FB1 FB2: "FERRITE BEAD 1K OHM 0805 1LN", Case Code (Imperial)=0805, Case Code (Metric)=2012, DC Resistance (DCR)=300mR, LCSC Part Number=C307765, Manufacturer=TDK, Max Current Rating=500mA, Max Operating Temperature=125°C, Min Operating Temperature=-55°C, Package Quantity=4000, Ratings=AEC-Q200, Supplier Part Number 1=445-MMZ2012R102ATD25CT-ND, Test Frequency=100MHz, Tolerance=25%, Case/Package=0805, Category="Ferrite Beads and Chips", ComponentLink1Description=http://www.mouser.com/ds/2/400/beads_automotive_signal_mmz_en-469244.pdf?src-supplier=Mouser, ComponentLink1URL=http://www.mouser.com/ds/2/400/beads_automotive_signal_mmz_en-469244.pdf?src-supplier=Mouser, ComponentLink2Description=https://product.tdk.com/info/en/catalog/datasheets/beads_automotive_signal_mmz2012_en.pdf?src-supplier=Digi-Key, ComponentLink2URL=https://product.tdk.com/info/en/catalog/datasheets/beads_automotive_signal_mmz2012_en.pdf?src-supplier=Digi-Key, Height=0.041inch, Impedance=1kR, Item Type="Ferrite Bead", Length=0.079inch, Manufacturer Part Number=MMZ2012R102ATD25, Max DC Current=500mA, Mount="Surface Mount", Number of Lines=1, Packaging="Tape and Reel", Pricing 1="1=0.11000, 10=0.09200, 25=0.08280, 50=0.06080, 100=0.05240, 250=0.04140, 500=0.03496, 1000=0.02944 (USD)", RoHS=Yes, RoHS Compliant=Yes, Stock 1=2942, Supplier 1=Digi-Key, Termination=SMD/SMT, Weight=0.000194oz, Width=0.049inch
J1: "Gold 250V 3A Straight Square Pins 2.5mm 3P 260℃ 6mm -40℃~+105℃ 3mm 2.54mm Plugin Black Brass 1x3P Plugin,P=2.54mm Pin Headers ROHS", LCSC Part Number=C706875, Manufacturer=XKB, Package=Plugin,P=2.54mm, ComponentLink1Description=LCSC, ComponentLink1URL=https://www.lcsc.com/product-detail/Pin-Headers_XKB-Connectivity-X6511WV-03H-C60D30_C706875.html, Item Type="Male Header", Manufacturer Part Number=X6511WV-03H-C60D30
J2: "CABLE ADAPTER 6 POS", Manufacturer=Tag-Connect, Package Quantity=1, Supplier Part Number 1=TC2030-IDC-ND, ComponentLink1Description=http://www.tag-connect.com/Materials/TC2030-MCP%20Datasheet.pdf?src-supplier=Digi-Key, ComponentLink1URL=http://www.tag-connect.com/Materials/TC2030-MCP%20Datasheet.pdf?src-supplier=Digi-Key, Manufacturer Part Number=TC2030-IDC, Pricing 1="1=43.71 (USD)", Stock 1=284, Supplier 1=Digi-Key
J3: "3A 1 5P Mother -40℃~+85℃ Micro-B SMD USB Connectors ROHS", LCSC Part Number=C319153, Manufacturer="XKB Connection", Package=SMD, ComponentLink1Description=LCSC, ComponentLink1URL=https://www.lcsc.com/product-detail/USB-Connectors_XKB-Connection-U-E-051N-4BH21-S1B_C319153.html, Item Type="USB Connectors", Manufacturer Part Number=U-E-051N-4BH21-S1B
J15: "PC TEST POINT MINIATURE RED", Color=Red, Flammability Rating="UL94 V-0", LCSC Part Number=C5199900, Manufacturer="Keystone Electronics", Package Quantity=100, Body Material=Bronze,PBT, ComponentLink1Description=https://datasheet.ciiva.com/11836/0900766b8009b7c7-11836046.pdf?src-supplier=Rs, ComponentLink1URL=https://datasheet.ciiva.com/11836/0900766b8009b7c7-11836046.pdf?src-supplier=Rs, ComponentLink2Description=https://datasheet.ciiva.com/16883/70182825-16883965.pdf?src-supplier=Allied+Electronics, ComponentLink2URL=https://datasheet.ciiva.com/16883/70182825-16883965.pdf?src-supplier=Allied+Electronics, ComponentLink3Description=https://datasheet.ciiva.com/2917/5000-5004-2917627.pdf?src-supplier=Digikey, ComponentLink3URL=https://datasheet.ciiva.com/2917/5000-5004-2917627.pdf?src-supplier=Digikey, Contact Material=Bronze, Contact Plating=Tin,Silver, Height=0.3inch, Hole Diameter=1.6mm, Inside Diameter=1.27mm, Insulation=Insulated, Item Type=Connector, Lead Free="Lead Free", Length=7.62mm, Manufacturer Part Number=5000, Material=Nylon,Bronze,Silver, Mounting Technology="PCB,Through Hole", Outside Diameter=2.54mm, Packaging=Bulk, Plating=Silver, Pricing="1=0.38, 25=0.308, 100=0.3015, 250=0.28304, 500=0.2523, 1000=0.17746, 2500=0.16225, 5000=0.15211 (USD)", Reach SVHC Compliant=No, RoHS=Yes, RoHS Compliant=Yes, Series=THM, Stock=24415, Supplier=Digikey
J16: "PC TEST POINT MINIATURE BLACK", Color=Black, LCSC Part Number=C238122, Manufacturer="Keystone Electronics", Package Quantity=100, Body Material=Bronze, ComponentLink1Description=https://datasheet.ciiva.com/11836/0900766b8009b7c7-11836045.pdf?src-supplier=Rs, ComponentLink1URL=https://datasheet.ciiva.com/11836/0900766b8009b7c7-11836045.pdf?src-supplier=Rs, ComponentLink2Description=https://datasheet.ciiva.com/27052/1581986-27052611.pdf?src-supplier=Jameco, ComponentLink2URL=https://datasheet.ciiva.com/27052/1581986-27052611.pdf?src-supplier=Jameco, ComponentLink3Description=https://datasheet.ciiva.com/22631/1703983-22631100.pdf?src-supplier=Element14, ComponentLink3URL=https://datasheet.ciiva.com/22631/1703983-22631100.pdf?src-supplier=Element14, ComponentLink4Description=https://datasheet.ciiva.com/16318/m60-2p60-16318423.pdf?src-supplier=Future+Electronics, ComponentLink4URL=https://datasheet.ciiva.com/16318/m60-2p60-16318423.pdf?src-supplier=Future+Electronics, Contact Material=Bronze, Contact Plating=Tin,Silver, Diameter=2.54mm, Hole Diameter=1.6mm, Housing Color=Black, Inside Diameter=1.27mm, Insulation=Insulated, Insulation Material=Nylon, Item Type=Connector, Lead Free="Lead Free", Length=7.62mm, Manufacturer Part Number=5001, Material=Nylon,Bronze,Silver, Mounting Technology="Through Hole", Number of Contacts=1, Number of Ports=1, Orientation=Straight, Outside Diameter=2.54mm, Packaging=Bulk, Plating=Silver, Pricing="1=0.38, 25=0.308, 100=0.3015, 250=0.28304, 500=0.2523, 1000=0.17746, 2500=0.16225, 5000=0.15211 (USD)", Reach SVHC Compliant=No, RoHS=Yes, RoHS Compliant=Yes, Series=THM, Stock=323409, Supplier=Digikey, Termination="Through Hole"
J17: "PC TEST POINT MULTIPURPOSE WHITE", LCSC Part Number=C2906766, Manufacturer="Keystone Electronics", ComponentLink1Description=https://datasheet.ciiva.com/27052/1582065-27052612.pdf?src-supplier=Jameco, ComponentLink1URL=https://datasheet.ciiva.com/27052/1582065-27052612.pdf?src-supplier=Jameco, ComponentLink2Description=https://datasheet.ciiva.com/16200/m60-2p60-16200039.pdf?src-supplier=Future+Electronics, ComponentLink2URL=https://datasheet.ciiva.com/16200/m60-2p60-16200039.pdf?src-supplier=Future+Electronics, ComponentLink3Description=https://datasheet.ciiva.com/22631/1703983-22631115.pdf?src-supplier=Element14, ComponentLink3URL=https://datasheet.ciiva.com/22631/1703983-22631115.pdf?src-supplier=Element14, ComponentLink4Description=https://datasheet.ciiva.com/16884/70182825-16884150.pdf?src-supplier=Allied+Electronics, ComponentLink4URL=https://datasheet.ciiva.com/16884/70182825-16884150.pdf?src-supplier=Allied+Electronics, ComponentLink5Description=https://datasheet.ciiva.com/2917/5012-2917634.pdf?src-supplier=Digikey, ComponentLink5URL=https://datasheet.ciiva.com/2917/5012-2917634.pdf?src-supplier=Digikey, ComponentLink6Description=https://datasheet.ciiva.com/1454/1703983-1454835.pdf?src-supplier=Element14, ComponentLink6URL=https://datasheet.ciiva.com/1454/1703983-1454835.pdf?src-supplier=Element14, Item Type=Connectors, Manufacturer Part Number=5012, Pricing="1=0.38, 25=0.308, 100=0.3015, 250=0.28304, 500=0.2523, 1000=0.17746, 2500=0.16225, 5000=0.15211 (USD)", RoHS=Yes, Stock=102631, Supplier=Digikey
L1: library part SRN4018-4R7M, "FIXED IND 4.7UH 1.9A 84 MOHM SMD", Case/Package=Nonstandard, Current Rating=1.9A, DC Resistance (DCR)=84mR, Inductance Tolerance=20%, LCSC Part Number=C780206, Manufacturer=Bourns, Max Operating Temperature=120°C, Min Operating Temperature=-25°C, Package Quantity=3000, Saturation Current=2A, Self Resonant Frequency=35MHz, Supplier Part Number=C135270, Test Frequency=100kHz, Category="Fixed Inductors", ComponentLink1Description=https://datasheet.ciiva.com/6700/srn4018-6700960.pdf?src-supplier=Digikey, ComponentLink1URL=https://datasheet.ciiva.com/6700/srn4018-6700960.pdf?src-supplier=Digikey, Core Material=Ferrite, Depth=4.2mm, ESR=84mR, Height=1.8mm, Height - Seated (Max)=0.071inch, Length=4mm, Manufacturer Part Number=SRN4018-4R7M, Material=Steel, Max DC Current=1.9A, Mounting Technology="Surface Mount", Packaging="Cut Tape", Pins=2, Pricing="10=0.0497, 100=0.0399, 300=0.035, 2000=0.0313, 4000=0.0283, 10000=0.0269 (USD)", Q Factor=9NUMBER, Radiation Hardening=No, Reach SVHC Compliant=No, RMS Current (Irms)=1.9A, RoHS=Yes, RoHS Compliant=Yes, Sample Rate (Hz)=100kHz, Series=SRN4018, Shielding=Shielded, Stock=13110, Supplier=Rs, Termination=SMD/SMT, Tolerance=20%, Width=4mm
LED1 LED2 LED3 LED4: library part NCD0603R3, "RED LED 0603 Light Emitting Diodes", LCSC Part Number=C3151730, Manufacturer="Foshan NationStar Optoelectronics", Package=0603, ComponentLink1Description=LCSC, ComponentLink1URL=https://www.lcsc.com/product-detail/Light-Emitting-Diodes-LED_Foshan-NationStar-Optoelectronics-NCD0603R3_C3151730.html, Item Type=LED, Manufacturer Part Number=NCD0603R3
LED5: library part NCD0603Y2, "yellow 0603 Light Emitting Diodes (LED) ROHS", LCSC Part Number=C89811, Manufacturer="Foshan NationStar Optoelectronics", Package=0603, ComponentLink1Description=LCSC, ComponentLink1URL=https://www.lcsc.com/product-detail/Light-Emitting-Diodes-LED_Foshan-NationStar-Optoelectronics-NCD0603Y2_C89811.html, Item Type=LED, Manufacturer Part Number=NCD0603Y2
P1 TP1 TP2: "Test Point ON"
  P1: Item Type="Test Point", Manufacturer Part Number="TEST POINT 0.5mm Dia"
  TP1 TP2: Item Type="TEST POINT"
P2 P3 P4 P5 P6 P7 P8 P9 P10 P11 P12 P13 P14 P15 P16 P17 P18 P19 P20 P21 P22 P23 P24 P25 P26 P27 P28 P29 P30 P31 P32 P33: "Test pad"
R1 R11 R28 R47 R55 R61 R68 R74 R78 R83: library part RC0402FR-0710KL, "RES 10K OHM 1% 1/16W 0402", Case Code (Imperial)=0402, Case Code (Metric)=1005, LCSC Part Number=C60490, Manufacturer=Yageo, Max Operating Temperature=155°C, Max Power Dissipation=63mW, Min Operating Temperature=-55°C, Power Rating=62.5mW, Resistance=10kR, Resistance Tolerance=1%, Resistor Type="Thick Film", Supplier Part Number 1=603-RC0402FR-0710KL, Temperature Coefficient=100ppm/°C, Voltage Rating=50V, Case/Package=0402, Category="Chip SMD Resistors", ComponentLink1Description=https://datasheet.ciiva.com/7660/38568-7660787.pdf?src-supplier=Element14, ComponentLink1URL=https://datasheet.ciiva.com/7660/38568-7660787.pdf?src-supplier=Element14, ComponentLink2Description=https://datasheet.ciiva.com/7849/1686128-7849814.pdf?src-supplier=Element14, ComponentLink2URL=https://datasheet.ciiva.com/7849/1686128-7849814.pdf?src-supplier=Element14, ComponentLink3Description=https://datasheet.ciiva.com/7983/1018594-7983486.pdf?src-supplier=Element14, ComponentLink3URL=https://datasheet.ciiva.com/7983/1018594-7983486.pdf?src-supplier=Element14, ComponentLink4Description=https://datasheet.ciiva.com/22747/1018594-22747512.pdf?src-supplier=Element14, ComponentLink4URL=https://datasheet.ciiva.com/22747/1018594-22747512.pdf?src-supplier=Element14, ComponentLink5Description=https://datasheet.ciiva.com/12667/pyu-rc0402-51-rohs-l-6-r-12667067.pdf?src-supplier=Mouser, ComponentLink5URL=https://datasheet.ciiva.com/12667/pyu-rc0402-51-rohs-l-6-r-12667067.pdf?src-supplier=Mouser, ComponentLink6Description=https://datasheet.ciiva.com/7849/1784430-7849813.pdf?src-supplier=Element14, ComponentLink6URL=https://datasheet.ciiva.com/7849/1784430-7849813.pdf?src-supplier=Element14, ComponentLink7Description=https://datasheet.ciiva.com/7849/1784430-7849815.pdf?src-supplier=Element14, ComponentLink7URL=https://datasheet.ciiva.com/7849/1784430-7849815.pdf?src-supplier=Element14, Construction=Rectangular, Depth=0.5mm, Features="Moisture Resistant", Height=0.32mm, Item Type=Resistor, Lead Free="Lead Free", Lead Pitch=0.2mm, Length=1mm, Manufacturer Part Number=RC0402FR-0710KL, Military Standard=Not, Number of Pins=2, Number of Terminations=2, Packaging="Tape and Reel", Pricing 1="1=0.10000, 10=0.01400, 50=0.01400, 100=0.00500, 1000=0.00300, 10000=0.00200 (USD)", REACH SVHC="No SVHC", RoHS=Yes, RoHS Compliant=Yes, Series=RC, Stock 1=18648329, Supplier 1=Mouser, Termination=SMD/SMT, Tolerance=1%, Voltage Rating (DC)=50V, Width=0.5mm, Working Voltage=50V
R2 R94: library part RC0402FR-073K9L, "RES 3.9K OHM 1% 1/16W 0402", Case Code (Imperial)=0402, Case Code (Metric)=1005, LCSC Part Number=C131467, Manufacturer=Yageo, Max Operating Temperature=155°C, Max Power Dissipation=63mW, Min Operating Temperature=-55°C, Power Rating=62.5mW, Resistance Tolerance=1%, Resistor Type="Thick Film", Supplier Part Number=9808155, Temperature Coefficient=100ppm/°C, Voltage Rating=50V, Case/Package=0402, Category="Chip SMD Resistors", ComponentLink1Description=https://datasheet.ciiva.com/12666/pyu-rc0402-51-rohs-l-6-r-12666997.pdf?src-supplier=Mouser, ComponentLink1URL=https://datasheet.ciiva.com/12666/pyu-rc0402-51-rohs-l-6-r-12666997.pdf?src-supplier=Mouser, ComponentLink2Description=https://datasheet.ciiva.com/7849/1018594-7849989.pdf?src-supplier=Element14, ComponentLink2URL=https://datasheet.ciiva.com/7849/1018594-7849989.pdf?src-supplier=Element14, ComponentLink3Description=https://datasheet.ciiva.com/7849/1018594-7849990.pdf?src-supplier=Element14, ComponentLink3URL=https://datasheet.ciiva.com/7849/1018594-7849990.pdf?src-supplier=Element14, ComponentLink4Description=https://datasheet.ciiva.com/15189/getdatasheetpartid-469246-15189453.pdf?src-supplier=Verical, ComponentLink4URL=https://datasheet.ciiva.com/15189/getdatasheetpartid-469246-15189453.pdf?src-supplier=Verical, Construction=Rectangular, Depth=0.5mm, Features="Moisture Resistant", Item Type=Resistor, Lead Free="Lead Free", Length=1mm, Manufacturer Part Number=RC0402FR-073K9L, Military Standard=Not, Number of Terminations=2, Packaging="Tape and Reel", Pricing="10000=0.0011, 100000=0.0011, 300000=0.001, 750000=0.001, 2000000=0.0009 (USD)", Reach SVHC Compliant=Unknown, RoHS=Yes, RoHS Compliant=Yes, Series=RC, Stock=6910000, Supplier="Future Electronics", Termination=SMD/SMT, Tolerance=1%, Voltage Rating (AC)=50V
R3: library part RT0402BRC076K8L, "RES SMD 6.8K OHM 0.1% 1/16W 0402", Case/Package=0402, LCSC Part Number=C852943, Manufacturer=Yageo, Max Operating Temperature=155°C, Max Power Dissipation=63mW, Min Operating Temperature=-55°C, Temperature Coefficient=15ppm/°C, Tolerance=0.1%, Features="Moisture Resistant", Height=0.014inch, Item Type=Resistors, Length=0.039inch, Manufacturer Part Number=RT0402BRC076K8L, Number of Terminations=2, Packaging="Tape and Reel", Pricing="1=0.51, 10=0.36, 50=0.279, 100=0.2487, 500=0.18748, 1000=0.16452, 5000=0.14066 (USD)", RoHS=Yes, RoHS Compliant=Yes, Series=RT, Stock=20494, Supplier=Digikey, Width=0.02inch
R4 R6: library part RC0402FR-07499RL, "RES 499 OHM 1% 1/16W 0402", Case Code (Imperial)=0402, Case Code (Metric)=1005, LCSC Part Number=C137970, Manufacturer=Yageo, Max Operating Temperature=155°C, Max Power Dissipation=63mW, Min Operating Temperature=-55°C, Package Quantity=1, Power Rating=62.5mW, Resistance Tolerance=1%, Resistor Type="Thick Film", Supplier Part Number 1=603-RC0402FR-07499RL, Temperature Coefficient=100ppm/°C, Voltage Rating=50V, Case/Package=0402, Category="Chip SMD Resistors", ComponentLink1Description=https://datasheet.ciiva.com/2453/pyu-r-int-thick-7-2453539.pdf?src-supplier=Digi-Key, ComponentLink1URL=https://datasheet.ciiva.com/2453/pyu-r-int-thick-7-2453539.pdf?src-supplier=Digi-Key, ComponentLink2Description=https://datasheet.ciiva.com/2453/pyu-r-int-thick-7-2453540.pdf?src-supplier=Digi-Key, ComponentLink2URL=https://datasheet.ciiva.com/2453/pyu-r-int-thick-7-2453540.pdf?src-supplier=Digi-Key, ComponentLink3Description=https://datasheet.ciiva.com/2453/pyu-r-int-thick-7-2453538.pdf?src-supplier=Digi-Key, ComponentLink3URL=https://datasheet.ciiva.com/2453/pyu-r-int-thick-7-2453538.pdf?src-supplier=Digi-Key, Construction=Rectangular, Depth=0.5mm, Features="Moisture Resistant", Height=0.016inch, Lead Free="Lead Free", Length=1mm, Manufacturer Part Number=RC0402FR-07499RL, Military Standard=Not, Number of Terminations=2, Packaging="Tape and Reel", Pricing 1="1=0.10000, 10=0.01200, 50=0.01200, 100=0.00500, 1000=0.00300, 10000=0.00100 (USD)", REACH SVHC="No SVHC", Resistance=499R, RoHS=Yes, RoHS Compliant=Yes, Series=RC, Size Code=0402, Stock 1=936879, Supplier 1=Mouser, Termination=SMD/SMT, Tolerance=1%, Voltage Rating (DC)=50V, Width=0.02inch